# Altium PCB OFP_MCM_v1.5.PcbDoc (part 7 of 8)
Units mm, origin at the board's own origin, x right, y up, seen from the top; angles counter-clockwise.
Board outline 110 x 120 mm, 4 copper layers (Top Layer, Layer 1, Layer 2, Bottom Layer), stack 1.576 mm thick; 353 components, 268 nets, 1240 pads, 519 vias.
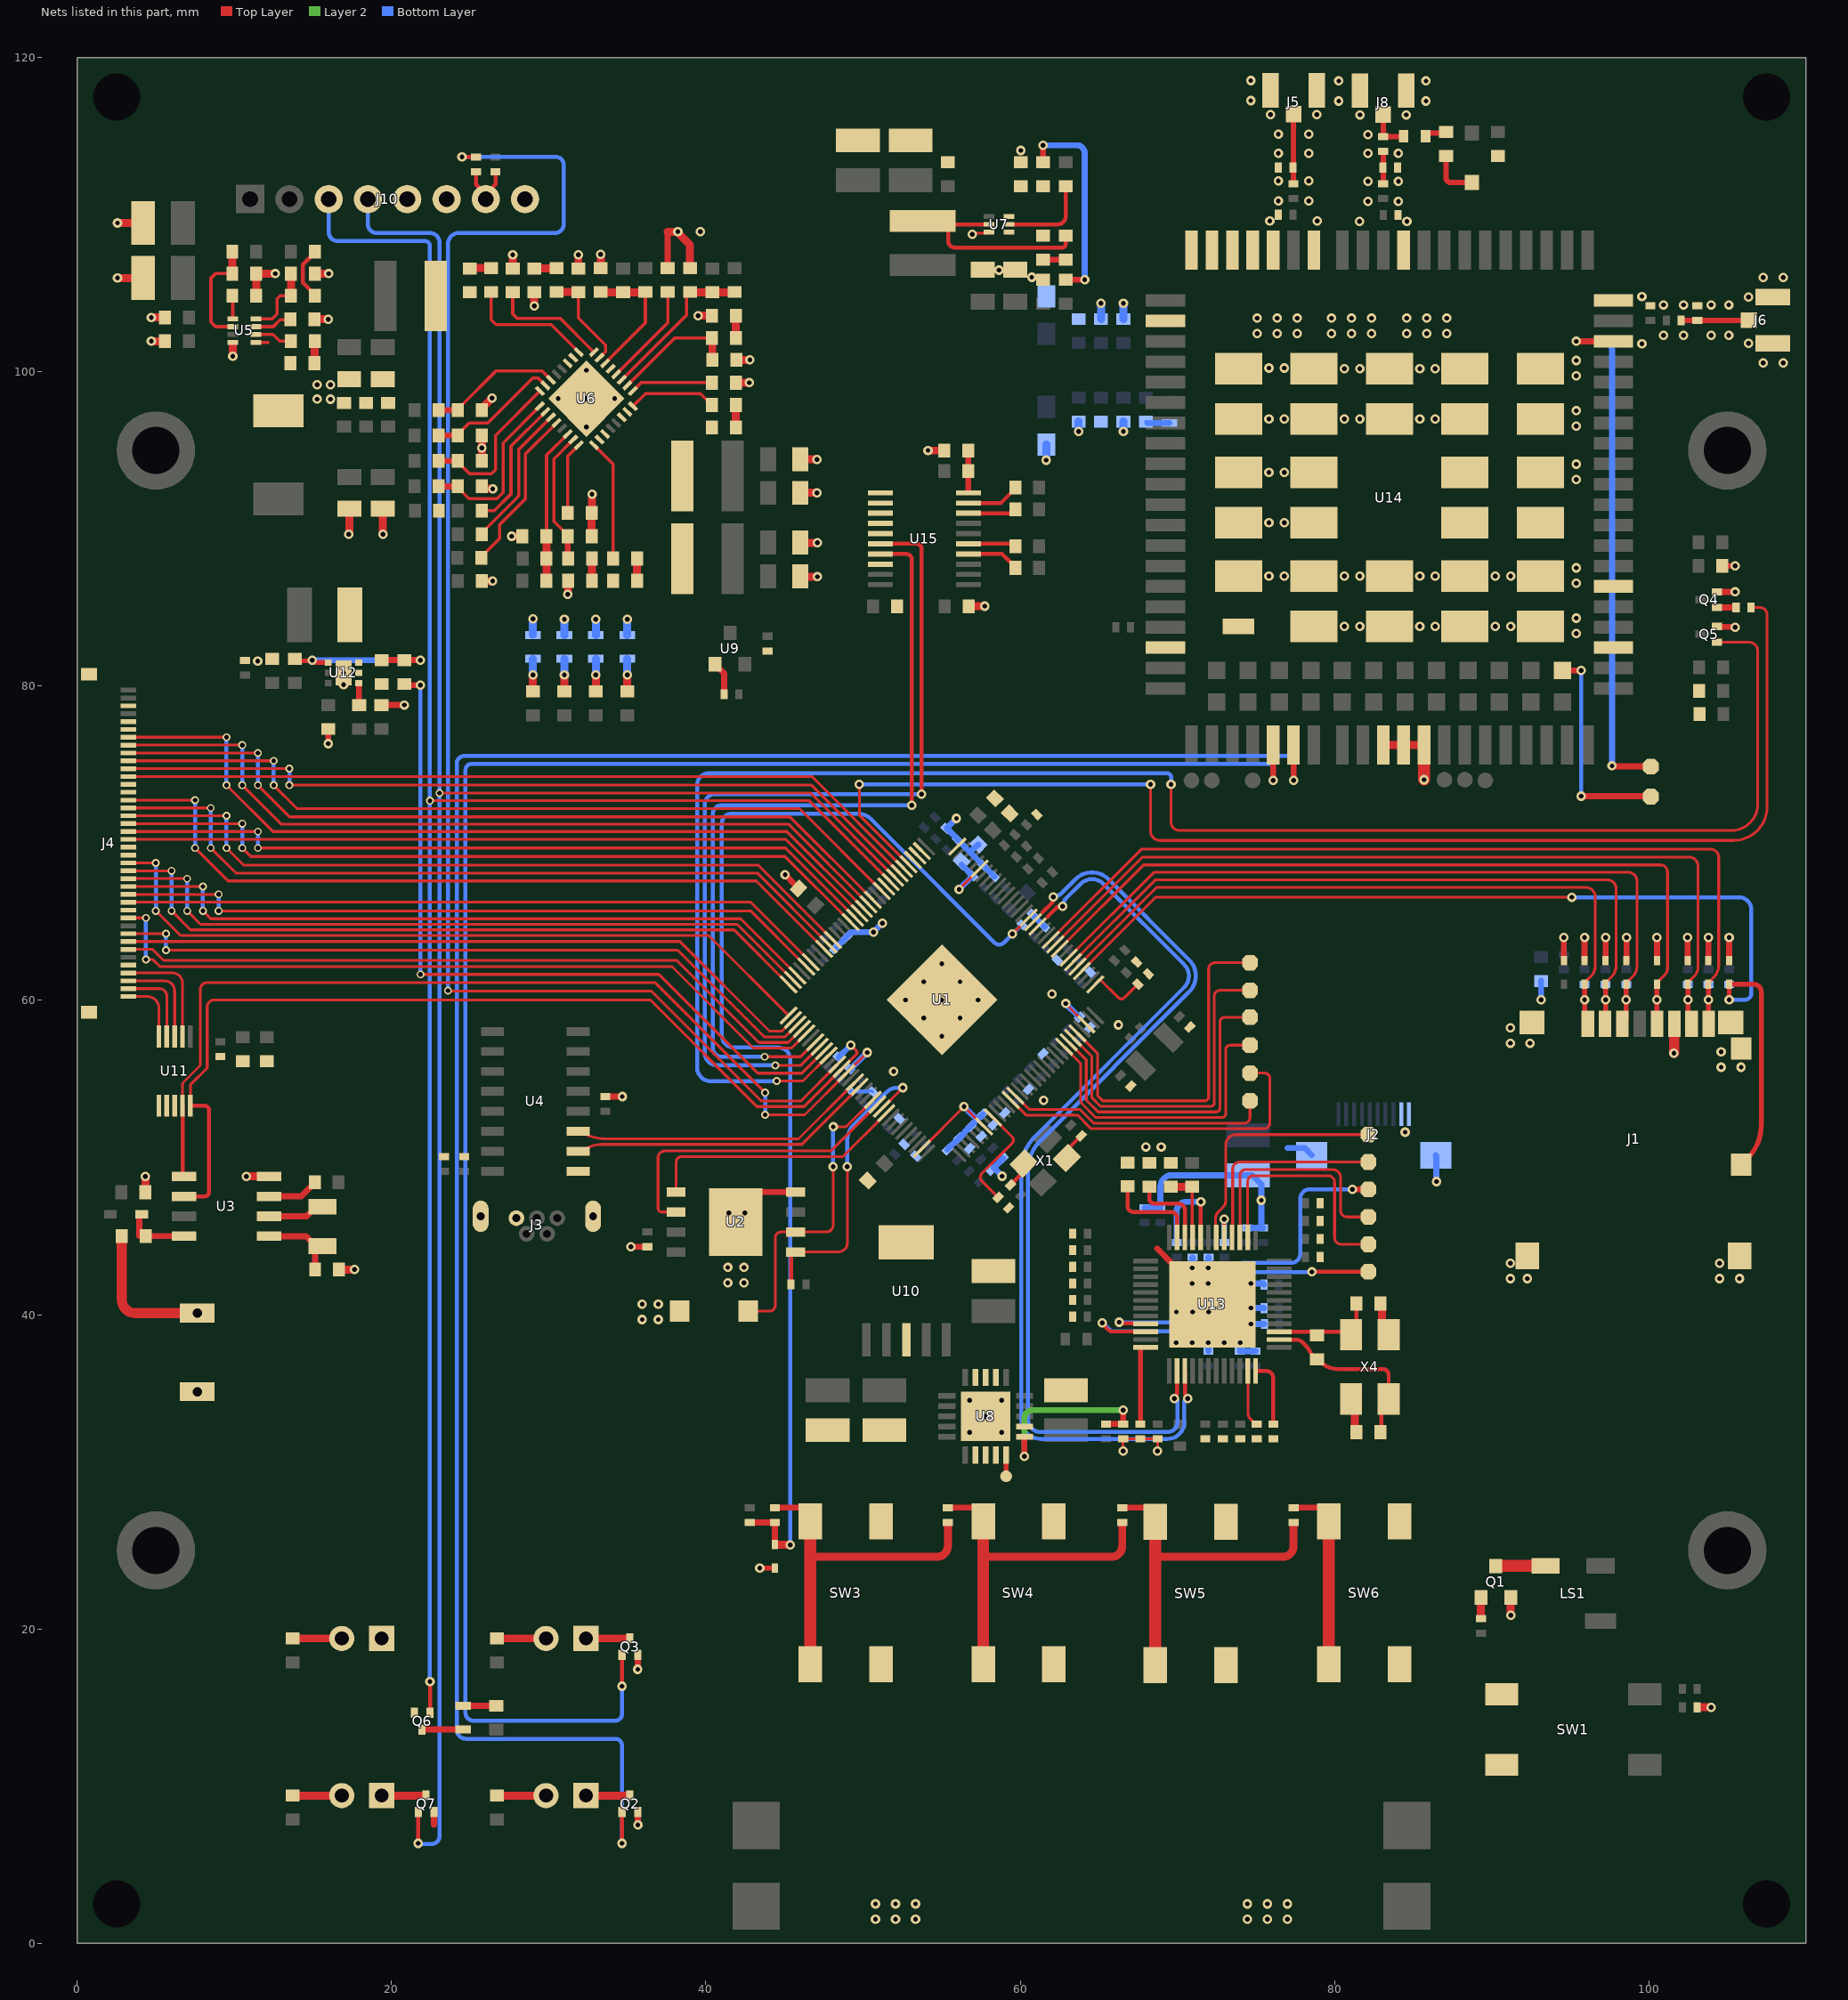
[diagram p5: the nets of this part, all layers, seen from the top]

## Via types
v1: diameter 0.6, hole 0.3, Top Layer to Bottom Layer, tented both sides, 475 vias
v2: diameter 0.5, hole 0.3, Top Layer to Bottom Layer, tented both sides, 44 vias

## Nets (pads, with @x,y where several pads share a name; then routed paths per layer and width w, separated by ;. In a path a pad name is that pad's centre, name@x,y a point inside that pad or via, vN(x,y) a via of type N, cw(c..) or ccw(c..) an arc to the next point about the centre after c; other vN are vias at no path point) (continued)
GND: C1.1 C2.1 C3.1 C4.1 C5.1 C6.1 C7.1 C8.2 C9.1 C10.1 C11.1 C12.1 C13.1 C14.1 C15.1 C16.1 C17.1 C18.1 C23.1 C24.1 C25.1 C26.1 C27.1 C28.1 C29.1 C30.1 C31.1 C32.1 C33.1 C34.1 C35.1 C36.1 C37.1 C38.1 C39.1 C40.1 C41.1 C42.1 C43.1 C44.1 C45.1 C46.1 C47.1 C48.1 C49.1 C50.1 C51.1 C52.1 C56.1 C57.1 C58.1 C59.1 C60.1 C61.1 C62.2 C63.2 C64.1 C67.1 C68.1 C69.2 C70.2 C71.1 C74.1 C76.1 C77.1 C78.1 C79.1 C80.1 C81.1 C82.1 C83.1 C84.1 C85.2 C86.2 C87.1 C88.1 C89.1 C90.1 C91.1 C92.1 C93.1 C94.1 C95.1 C96.1 C97.1 C98.1 C99.1 C100.2 C101.1 C102.1 C103.1 C104.1 C105.2 C106.1 C107.1 C108.1 C109.1 C110.1 C111.1 C112.1 C113.1 C114.1 C115.1 C116.1 C117.1 C118.1 C119.1 C120.1 C121.1 C122.1 C123.1 C124.1 C125.1 C126.1 C127.1 C128.1 C129.1 C130.1 C131.1 C132.1 C133.1 C134.1 C135.1 C136.1 C137.1 C138.1 C139.1 C140.1 C141.1 C142.1 C143.1 C145.1 C146.1 C149.1 D1.1 D2.1 D3.1 D4.1 D5.1 D6.1 D7.1 D8.1 D10.1 J1.6 J1.DN J1.SH1 J1.SH2 J1.SH3 J1.SH4 J2.9 J2.10 J2.MP1 J2.MP2 J3.5 J3.SH1 J3.SH2 J4.5 J4.12 J4.19 J4.20 J4.27 J4.28 J4.35 J4.36 J4.38 J4.S1 J4.S2 J5.2 J5.3 J6.2 J6.3 J8.2 J8.3 J10.8 LED1.1 LED2.2 LED3.2 LED4.2 LED5.2 Q1.2 Q2.1 Q3.1 Q4.1 Q5.1 Q6.1 Q7.1 R9.2 R29.1 R30.1 R37.2 R43.2 R45.1 R46.1 R48.2 R54.2 R60.2 R64.1 R66.1 R68.1 R73.1 R74.1 R75.1 R76.1 R85.1 R86.1 R87.1 R89.1 R90.1 R91.1 R95.1 R100.2 R104.1 SW1.1 SW2.2 SW3.1 SW3.2 SW4.1 SW4.2 SW5.1 SW5.2 SW6.1 SW6.2 U1.129 U2.4 U2.9 U3.4 U4.1 U5.4 U6.11 U6.14 U6.21 U6.27 U6.33 U7.3 U8.2 U8.3 U8.4 U8.12 U8.13 U8.14 U8.17 U8.21 U9.1 U10.3 U10.6 U11.6 U11.8 U12.5 U12.7 U13.49 U14.8 U14.9 U14.10 U14.19 U14.22 U14.36 U14.46 U14.48 U14.50 U14.51 U14.52 U14.53 U14.54 U14.56 U14.72 U14.85 U14.86 U14.87 U14.88 U14.89 U14.90 U14.91 U14.92 U14.93 U14.94 U14.95 U14.96 U14.97 U14.98 U14.99 U14.100 U14.101 U14.102 U14.103 U14.104 U14.105 U14.106 U14.107 U14.108 U14.109 U14.110 U14.111 U14.112 U15.11 X1.2 X1.4 X4.2 X4.4 | length 151.6
  Top Layer w0.178: v1(56.961,108.76) 57.031,108.83 57.95,108.83 U7.3@58.011,108.891 ; v1(66.552,31.327) R68.1@66.552,32.108 R87.1@67.64,32.108 C117.1@68.746,32.108 v1(68.746,31.327) ; U13.49@70.895,42.833 72.779,42.13 73.963,41.688 U13.49@72.232,40.667 cw(c72.232,41.952) 72.191,40.667 cw(c72.232,41.952) 72.157,40.669 cw(c72.232,41.952) 70.947,41.914 cw(c72.232,41.952) 70.947,41.952 v1(70.947,41.991) ; Q5.1@104.349,83.803 Q5.1@104.356,83.81
  Top Layer w0.254: R76.1@25.74,92.717 R76.1@25.747,92.71 ; Q3.1@35.666,18.35 Q3.1@35.677,18.34 ; C2.1@59.386,48.258 60.221,49.093 X1.2@60.221,49.623 ; X1.4@62.979,49.977 62.979,50.484 C1.1@63.882,51.388 ; v1(103.962,15.011) v1@103.962,15.015
  Top Layer w0.305: v1(43.434,23.87) D10.1@44.4,23.87
  Top Layer w0.381: v1(15.975,76.34) C98.1@15.975,77.277 ; R86.1@19.357,78.801 v1(20.816,78.801) ; 22.7,7.547 Q7.1@22.7,8.35 ; C13.1@33.698,53.884 v1(34.684,53.884) ; v1@35.238,44.325 C7.1@36.279,44.325 ; v1@35.666,7.547 Q2.1@35.666,8.35 ; v1(35.666,17.43) 35.666,18.329 Q3.1@35.677,18.34 ; R64.1@37.574,106.613 37.574,108.919 ; U9.1@40.592,81.401 40.811,81.132 40.939,81.039 41.162,80.816 C88.1@41.162,79.484 ; U2.9@41.915,45.9 41.915,46.296 43.424,47.805 U2.4@45.715,47.805 ; v1(45.041,68.005) 45.704,67.342 C37.1@45.898,67.122 ; C68.1@45.999,86.995 C68.1@46.028,86.966 ; C67.1@45.999,89.154 C67.1@46.028,89.125 ; 68.722,44.211 69.677,43.226 70.89,41.973 U13.49@70.909,41.954 ; D1.1@94.598,62.524 v1(94.598,64.008) ; D6.1@95.917,62.524 v1(95.917,64.008) ; D7.1@97.25,62.524 v1(97.25,64.008) ; D3.1@98.582,62.524 v1(98.582,64.008) ; D2.1@100.522,62.524 v1(100.522,64.008) ; D4.1@102.476,62.524 v1(102.476,64.008) ; D5.1@103.796,62.524 v1(103.796,64.008) ; Q4.1@104.349,86.003 v1(105.494,86.003) ; Q5.1@104.356,83.81 104.39,83.776 105.467,83.776 v1(105.494,83.75) ; R100.2@104.686,87.657 v1@105.494,87.657 ; D8.1@105.117,62.524 v1(105.117,64.008)
  Top Layer w0.508: v1(2.564,105.978) C47.1@4.194,105.978 ; v1(2.564,109.478) C48.1@4.194,109.478 ; C9.1@4.337,47.793 v1(4.337,48.805) ; v1(4.716,101.952) C49.1@5.591,101.952 ; v1(4.716,103.464) C149.1@5.591,103.464 ; v1(9.898,100.997) U5.4@9.898,101.766 ; v1(10.77,48.805) U3.4@12.2,48.805 ; R45.1@11.395,104.854 R43.2@11.395,106.254 v1(12.6,106.254) ; C56.1@15.1,103.352 v1(15.975,103.352) ; R46.1@15.125,106.254 v1(16,106.254) ; C10.1@16.662,42.875 v1(17.653,42.875) ; v1(17.272,89.662) 17.272,89.687 17.308,89.723 C51.1@17.308,91.284 ; v1(19.451,89.662) C50.1@19.451,91.284 ; C64.1@25.74,86.692 v1(26.434,86.692) ; R76.1@25.747,92.558 v1(26.441,92.558) ; R75.1@25.747,94.461 v1(25.747,95.155) R74.1@25.747,95.955 ; R73.1@25.913,97.845 v1(26.404,98.336) ; v1(27.636,89.541) R54.2@28.33,89.541 ; C71.1@27.714,106.587 v1(27.714,107.454) ; v1(29.083,104.197) C63.2@29.083,105.063 ; v1@31.219,85.849 C70.2@31.219,86.705 ; C62.2@31.891,106.587 v1(31.891,107.454) ; C69.2@32.737,89.541 C74.1@32.737,91.034 32.748,91.044 32.748,92.08 v1@32.758,92.091 ; R48.2@33.312,106.613 v1(33.312,107.479) ; 37.574,108.919 37.592,108.901 38.165,108.901 38.995,108.071 R60.2@38.995,106.613 ; v1(39.517,103.577) C86.2@40.384,103.577 ; C84.1@41.908,99.315 v1(42.775,99.315) ; C85.2@41.939,100.766 v1(42.805,100.766) ; C77.1@45.999,92.304 v1(47.07,92.304) ; C76.1@45.999,94.431 v1(47.07,94.431) ; C68.1@46.028,86.966 v1(47.099,86.966) ; C67.1@46.028,89.125 v1(47.099,89.125) ; v1(54.136,95) 54.144,94.992 55.163,94.992 R104.1@55.172,94.984 ; C139.1@56.713,85.076 C139.1@56.721,85.084 57.741,85.084 v1(57.749,85.092) ; C109.1@81.309,32.628 X4.4@81.309,34.086 ; C110.1@82.929,40.711 83.025,40.615 83.025,39.157 X4.2@83.451,38.731 ; U14.8@83.1,76.25 U14.9@84.4,76.25 U14.10@85.7,76.25 ; v1(91.222,20.873) Q1.2@91.222,22.006 ; C3.1@103.164,15.015 v1@103.962,15.015
  Top Layer w0.635: v1@101.622,56.664 J1.6@101.622,58.505
  Top Layer w0.762: v1(85.7,74.05) U14.10@85.7,76.25
  Bottom Layer w0.178: C39.1@49.272,54.183 49.415,54.183 49.469,54.183 C39.1@49.496,54.209 ; C42.1@50.322,54.209 50.362,54.249 50.56,54.249 C42.1@50.623,54.186
  Bottom Layer w0.254: C39.1@49.209,54.246 C39.1@49.272,54.183 ; C39.1@49.415,54.183 49.449,54.216 C42.1@50.315,54.216
  Bottom Layer w0.381: C38.1@48.208,63.288 49.275,64.355 v1(50.67,64.355) v1(51.236,64.92) ; v1(55.945,71.585) 55.326,70.967 55.409,70.878 55.954,70.332 C34.1@56.02,70.219 56.11,70.129 56.794,69.445 ; C11.1@57.356,69.931 56.794,69.445 ; C31.1@58.356,67.883 58.266,67.973 C12.1@57.643,68.596 56.794,69.445 ; v1(58.86,48.811) 58.319,49.351 58.916,49.949 C17.1@58.922,49.949 ; C26.1@60.785,65.48 60.863,65.379 61.468,64.774 C27.1@61.556,64.683 ; C124.1@67.912,46.798 C126.1@68.926,46.798 68.926,48.153 cw(c69.645,48.153) 69.645,48.872 C104.1@74.498,48.872 74.775,48.872 75.346,48.301 v1(75.346,47.282) 75.346,45.645 ccw(c75.465,45.645) C135.1@75.465,45.526 C128.1@74.451,45.526 ; v1(70.947,42.973) 70.961,42.987 70.961,43.632 C112.1@70.975,43.647 ; v1@71.969,38.373 71.976,38.367 71.976,37.693 C130.1@71.982,37.687 ; v1(71.969,42.973) 71.979,42.983 71.979,43.637 C113.1@71.989,43.647 ; v1@74.013,38.373 73.998,38.358 73.998,37.702 C134.1@73.982,37.687 C132.1@74.982,37.687 ; v1@74.552,39.412 75.499,39.412 C116.1@75.537,39.417 ; v1@74.552,40.435 75.479,40.435 C115.1@75.517,40.417 ; v1@74.552,41.991 75.479,41.991 C125.1@75.517,41.917 ; 77.027,50.616 78.091,50.616 J2.MP2@78.549,50.158 ; J2.MP1@86.449,50.158 86.487,50.12 v1(86.487,48.471) ; v1(93.157,60.049) C4.1@93.157,61.245
  Bottom Layer w0.508: LED2.2@29,83.278 v1(29,84.282) ; LED3.2@31,83.25 v1(31,84.254) ; LED4.2@33,83.25 v1(33,84.254) ; LED5.2@35,83.25 v1(35,84.254) ; v1(61.664,94.38) C105.2@61.664,95.384 ; v1(63.719,96.215) C106.1@63.719,96.838 ; C102.1@65.146,103.362 v1(65.146,104.366) ; v1(66.573,96.215) C108.1@66.573,96.838 ; C103.1@66.573,103.362 v1(66.573,104.366)
  other v1: 50.794,1.524 52.07,1.524 53.343,1.524 74.457,1.524 75.73,1.524 77.006,1.524 50.794,2.507 52.07,2.507 53.343,2.507 74.457,2.507 75.73,2.507 77.006,2.507 35.677,7.536 56.789,32.52 58.827,32.52 57.808,33.539 56.789,34.558 58.827,34.558 69.925,38.221 70.947,38.221 71.969,38.221 72.991,38.221 74.013,38.221 74.679,39.412 35.95,39.695 36.973,39.695 69.944,40.175 70.967,40.175 71.989,40.175 74.679,40.435 35.95,40.677 36.973,40.677 71.969,41.991 74.679,41.991 41.396,42.028 42.418,42.028 91.198,42.299 92.272,42.299 104.499,42.299 105.772,42.299 41.396,43.01 42.418,43.01 91.198,43.282 104.499,43.282 35.238,44.32 41.455,46.473 42.478,46.473 67.997,50.679 68.979,50.679 84.499,51.615 61.496,53.647 51.953,55.482 104.604,55.753 105.877,55.753 101.6,56.642 104.604,56.736 91.198,57.276 92.445,57.276 55.02,57.726 91.198,58.259 66.256,58.443 53.866,58.88 56.174,58.88 52.712,60.034 55.02,60.034 57.328,60.034 62.019,60.406 53.866,61.188 56.174,61.188 55.02,62.342 16.95,80.087 16.95,80.85 11.483,81.603 95.394,83.347 80.632,83.797 81.615,83.797 85.432,83.797 86.415,83.797 90.232,83.797 91.215,83.797 95.394,84.329 31.209,85.838 95.394,86.547 75.832,86.997 76.815,86.997 80.632,86.997 81.615,86.997 85.432,86.997 86.415,86.997 90.232,86.997 91.215,86.997 95.394,87.529 105.497,87.66 75.832,90.397 76.815,90.397 32.758,92.218 95.394,93.147 75.832,93.597 76.815,93.597 95.394,94.129 32.4,96.5 95.394,96.547 75.832,96.997 76.815,96.997 80.632,96.997 81.615,96.997 85.432,96.997 86.415,96.997 95.394,97.529 15.263,98.266 16.109,98.262 30.6,98.3 32.4,98.3 34.2,98.3 15.263,99.181 16.109,99.177 95.394,99.747 32.4,100.1 80.632,100.197 81.615,100.197 85.432,100.197 86.415,100.197 75.832,100.247 76.815,100.247 107.275,100.568 108.551,100.568 95.394,100.729 99.567,101.782 106.35,101.817 100.943,102.322 102.216,102.322 103.972,102.322 105.092,102.322 75.073,102.438 76.349,102.438 77.622,102.438 79.803,102.438 81.079,102.438 82.352,102.438 84.597,102.438 85.873,102.438 87.146,102.438 75.073,103.421 76.349,103.421 77.622,103.421 79.803,103.421 81.079,103.421 82.352,103.421 84.597,103.421 85.873,103.421 87.146,103.421 100.943,104.262 102.216,104.262 103.972,104.262 105.092,104.262 106.35,104.767 99.567,104.802 60.74,106.021 107.275,106.016 108.551,106.016 58.655,106.476 38.222,108.929 39.643,108.929 81.59,109.575 84.61,109.575 75.89,109.6 78.91,109.6 82.13,110.85 84.07,110.85 76.43,110.875 78.37,110.875 82.13,112.123 84.07,112.123 76.43,112.148 78.37,112.148 76.43,113.904 78.37,113.904 82.13,113.904 84.07,113.904 60.043,114.094 82.13,115.1 76.43,115.125 78.37,115.125 81.625,116.358 84.575,116.358 75.925,116.383 78.875,116.383 80.274,117.241 85.824,117.241 74.676,117.266 80.274,118.517 85.824,118.517 74.676,118.542
GSM_CTS: U15.12
GSM_DCD: U15.18
GSM_DTR: U15.14
GSM_PWR: Q4.2 R117.1 | length 1.2
  Top Layer w0.381: Q4.2@104.349,85.002 R117.1@105.554,85.003
GSM_RI: U15.15
GSM_RST: Q5.2 U1.42 | length 112.3
  Top Layer w0.178: v2(44.505,54.873) 46.183,54.873 U1.42@47.808,56.498 ; v1(69.6,73.746) 69.6,71.357 ccw(c70.142,71.357) 70.142,70.815 105.258,70.815 ccw(c105.258,72.492) 106.934,72.492 106.934,82.226 ccw(c106.358,82.226) 106.358,82.802 Q5.2@104.349,82.802
  Bottom Layer w0.254: v2@44.428,54.86 40.313,54.86 cw(c40.313,55.728) 39.446,55.728 39.446,73.713 cw(c40.204,73.713) 40.204,74.47 69.319,74.47 cw(c69.319,74.168) 69.621,74.168 69.621,73.767 cw(c69.6,73.767) v1(69.6,73.746)
GSM_RTS: U15.13
HPVCCBP: C11.2 C12.2 U1.123 | length 4.1
  Top Layer w0.178: v1(56.116,67.069) U1.123@57.424,68.377
  Bottom Layer w0.381: v1@56.117,67.069 C12.2@56.991,67.944 ; C11.2@56.278,68.632 C12.2@56.979,67.931
HUB_XI: C109.2 R93.1 U13.38 X4.1 | length 11.7
  Top Layer w0.254: U13.38@76.495,38.429 77.155,38.415 77.525,38.407 cw(c77.52,38.153) 77.528,38.407 cw(c77.497,37.653) 78.03,38.187 cw(c75.979,36.134) 78.578,37.424 R93.1@78.895,37.17 79.204,36.916 ccw(c80.195,38.066) 80.195,36.548 83.062,36.548 cw(c83.062,36.16) 83.451,36.16 X4.1@83.451,34.631 82.984,34.164 82.984,32.587 C109.2@82.929,32.532
HUB_XO: C110.2 R93.2 U13.39 X4.3 | length 6.6
  Top Layer w0.178: X4.3@81.051,38.731 X4.3@81.405,39.085
  Top Layer w0.254: U13.39@76.482,38.917 R93.2@78.641,38.917 ; R93.2@78.895,38.694 79.118,38.917 80.866,38.917 X4.3@81.051,38.731 ; X4.3@81.405,39.085 C110.2@81.405,40.711
I2C0_SCL: R18.2 U1.45 U3.6 U11.10 | length 62.7
  Top Layer w0.178: U11.10@7.2,53.3 7.2,54.626 8.267,55.692 8.267,59.561 cw(c8.74,59.561) 8.74,60.034 36.466,60.034 43.255,53.245 46.252,53.245 U1.45@48.657,55.65 49.571,56.564 ccw(c49.447,56.688) 49.571,56.812 v1(49.231,57.152)
  Top Layer w0.254: U3.6@6.8,47.535 8.126,47.535 ccw(c8.126,47.793) 8.384,47.793 8.384,53.018 ccw(c8.102,53.018) 8.102,53.3 U11.10@7.2,53.3
  Bottom Layer w0.381: R18.2@48.451,56.332 48.451,56.377 v1@49.226,57.152
I2C0_SDA: R19.2 U1.46 U3.5 U11.9 | length 62.6
  Top Layer w0.178: U3.5@6.7,48.905 ccw(c6.8,48.905) U3.5@6.8,48.805 ; U11.9@6.7,53.3 6.7,54.734 7.833,55.867 7.833,60.708 cw(c8.267,60.708) 8.267,61.141 36.764,61.141 v2(43.776,54.129) ; v2@43.748,52.72 46.292,52.72 U1.46@48.939,55.367 ; U1.46@48.939,55.367 v1@50.261,56.689
  Top Layer w0.254: U3.5@6.7,48.905 U11.9@6.7,53.3
  Bottom Layer w0.254: v2(43.776,52.72) v2(43.776,54.129)
  Bottom Layer w0.381: R19.2@49.205,55.578 49.205,55.632 v1@50.257,56.684
  other v1: 50.266,56.684
KEYADC0: C26.2 D10.2 R11.1 R13.1 U1.112 | length 78.3
  Top Layer w0.178: v1(59.497,64.228) U1.112@60.535,65.266
  Top Layer w0.381: R11.1@42.8,26.783 R13.1@44.4,26.783 D10.2@44.4,25.369
  Top Layer w0.508: D10.2@44.458,25.362 45.357,25.362 v1@45.358,25.361
  Bottom Layer w0.254: v1@45.361,25.362 45.361,56.273 ccw(c44.63,56.273) 44.63,57.003 41.784,57.003 cw(c41.784,57.766) 41.021,57.766 41.021,71.272 cw(c41.631,71.272) 41.631,71.882 49.68,71.882 49.683,71.882 cw(c49.682,70.706) 50.513,71.538 50.514,71.537 51.4,70.651 51.406,70.645 58.375,63.675 ccw(c58.673,63.97) 58.969,63.675 v1@59.51,64.215 ; v1@59.505,64.219 60.012,64.726 C26.2@60.12,64.815
  other v1: 45.364,25.355
LCD_CLK: J4.11 U1.37 | length 48.5
  Top Layer w0.178: J4.11@3.25,65.25 v2@4.4,65.25 ; v2@4.4,62.6 4.82,62.6 5.269,62.151 37.849,62.151 43.03,56.97 45.451,56.97 U1.37@46.394,57.913
  Bottom Layer w0.254: v2(4.375,65.25) 4.375,62.626 v2@4.4,62.6
  other v2: 4.375,62.6
LCD_D2: J4.18 U1.33 | length 47.8
  Top Layer w0.178: J4.18@3.25,68.75 v2(5,68.75) ; v2(5,65.7) 6.567,64.133 40.173,64.133 U1.33@45.262,59.044
  Bottom Layer w0.254: v2(5,65.7) v2(5,68.75)
LCD_D3: J4.17 U1.32 | length 46.5
  Top Layer w0.178: J4.17@3.25,68.25 v2(6,68.25) ; v2(6,65.7) 7.211,64.489 41.797,64.489 U1.32@45.262,61.023
  Bottom Layer w0.254: v2(6,65.7) v2(6,68.25)
LCD_D4: J4.16 U1.31 | length 46.2
  Top Layer w0.178: J4.16@3.25,67.75 v2(7,67.75) ; v2(7,65.7) 7.856,64.844 42.007,64.844 U1.31@45.545,61.306
  Bottom Layer w0.254: v2(7,65.7) v2(7,67.75)
LCD_D5: J4.15 U1.30 | length 45.8
  Top Layer w0.178: J4.15@3.25,67.25 v2(8,67.25) ; v2(8,65.7) 8.5,65.2 42.217,65.2 U1.30@45.828,61.589
  Bottom Layer w0.254: v2(8,65.7) v2(8,67.25)
LCD_D6: J4.14 U1.28 | length 45.7
  Top Layer w0.178: J4.14@3.25,66.75 v2(9,66.75) ; v2(9,65.7) 42.848,65.7 U1.28@46.394,62.155
  Bottom Layer w0.254: v2(9,65.7) v2(9,66.75)
LCD_D7: J4.13 U1.27 | length 45
  Top Layer w0.178: J4.13@3.25,66.25 42.864,66.25 U1.27@46.677,62.438
LCD_D10: J4.26 U1.24 | length 50
  Top Layer w0.178: J4.26@3.25,72.75 v2(7.5,72.75) ; v2(7.5,69.7) 9.595,67.605 43.206,67.605 U1.24@47.525,63.286
  Bottom Layer w0.254: v2(7.5,69.7) v2(7.5,72.75)
LCD_D11: J4.25 U1.23 | length 49.6
  Top Layer w0.178: J4.25@3.25,72.25 v2(8.5,72.25) ; v2(8.5,69.7) 10.094,68.106 43.271,68.106 U1.23@47.808,63.569
  Bottom Layer w0.254: v2(8.5,69.7) v2(8.5,72.25)
LCD_D12: J4.24 U1.22 | length 49.3
  Top Layer w0.178: J4.24@3.25,71.75 v2(9.5,71.75) ; v2(9.5,69.7) 10.591,68.609 43.334,68.609 U1.22@48.091,63.852
  Bottom Layer w0.254: v2(9.5,69.7) v2(9.5,71.75)
LCD_D13: J4.23 U1.18 | length 49.5
  Top Layer w0.178: J4.23@3.25,71.25 v2@10.5,71.25 ; v2(10.5,69.7) 11.036,69.164 45.042,69.164 U1.18@49.222,64.983
  Bottom Layer w0.254: v2(10.5,69.7) v2(10.5,71.25)
LCD_D14: J4.22 U1.17 | length 49.1
  Top Layer w0.178: J4.22@3.25,70.75 v2(11.5,70.75) ; v2(11.5,69.7) 45.071,69.7 U1.17@49.505,65.266
  Bottom Layer w0.254: v2(11.5,69.7) v2(11.5,70.75)
LCD_D15: J4.21 U1.16 | length 48.5
  Top Layer w0.178: J4.21@3.25,70.25 45.086,70.25 U1.16@49.788,65.549
LCD_D18: J4.34 U1.15 | length 53.1
  Top Layer w0.178: J4.34@3.25,76.75 v2(9.5,76.75) ; v2(9.5,73.7) 12.453,70.747 45.155,70.747 U1.15@50.071,65.832
  Bottom Layer w0.254: v2(9.5,73.7) v2(9.5,76.75)
LCD_D19: J4.33 U1.14 | length 52.8
  Top Layer w0.178: J4.33@3.25,76.25 v2(10.5,76.25) ; v2(10.5,73.7) 12.981,71.219 45.249,71.219 U1.14@50.353,66.115
  Bottom Layer w0.254: v2(10.5,73.7) v2(10.5,76.25)
LCD_D20: J4.32 U1.13 | length 52.5
  Top Layer w0.178: J4.32@3.25,75.75 v2(11.5,75.75) ; v2(11.5,73.7) 13.516,71.684 45.349,71.684 U1.13@50.636,66.397
  Bottom Layer w0.254: v2(11.5,73.7) v2(11.5,75.75)
LCD_D21: J4.31 U1.11 | length 52.3
  Top Layer w0.178: J4.31@3.25,75.25 v2(12.5,75.25) ; v2(12.5,73.7) 13.992,72.208 45.957,72.208 U1.11@51.202,66.963
  Bottom Layer w0.254: v2(12.5,73.7) v2(12.5,75.25)
LCD_D22: J4.30 U1.7 | length 52.5
  Top Layer w0.178: J4.30@3.25,74.75 13.49,74.75 v2(13.5,74.76) ; v2(13.5,73.7) 46.728,73.7 U1.7@52.333,68.094
  Bottom Layer w0.254: v2(13.5,73.7) v2(13.5,74.76)
LCD_D23: J4.29 U1.6 | length 51.8
  Top Layer w0.178: J4.29@3.25,74.25 46.743,74.25 U1.6@52.616,68.377
LCD_DE: J4.7 U1.36 | length 45.7
  Top Layer w0.178: J4.7@3.25,63.25 4.798,63.25 5.497,62.551 38.149,62.551 43.374,57.326 45.241,57.326 U1.36@46.111,58.195
LCD_HSYNC: J4.9 U1.35 | length 46.2
  Top Layer w0.178: J4.9@3.25,64.25 v2(5.65,64.25) ; v2(5.65,63.2) 38.2,63.2 43.719,57.681 45.031,57.681 U1.35@45.828,58.478
  Bottom Layer w0.254: v2(5.65,63.2) v2(5.65,64.25)
LCD_PB2: R83.1 U1.41 | length 48.3
  Top Layer w0.178: v2(21.844,61.656) 37.023,61.656 43.311,55.368 46.112,55.368 U1.41@47.525,56.781
  Top Layer w0.381: R83.1@20.816,80.061 v1(21.844,80.061)
  Bottom Layer w0.254: v2(21.844,61.656) v1(21.844,80.061)
LCD_VSYNC: J4.8 U1.34 | length 45
  Top Layer w0.178: J4.8@3.25,63.75 38.35,63.75 44.053,58.047 44.831,58.047 U1.34@45.545,58.761
MB_RXD: J10.6
MB_TXD: J10.5
MCU_RST: R118.2 U1.44 | length 95.6
  Top Layer w0.178: v2@23.592,60.724 v2@23.609,60.706 ; v2@23.609,60.604 36.521,60.604 43.525,53.601 46.041,53.601 U1.44@48.373,55.933
  Top Layer w0.254: v1@24.496,113.68 25.37,113.68 R118.2@25.38,113.67
  Bottom Layer w0.254: v2@23.592,60.724 23.592,108.134 cw(c24.3,108.134) 24.3,108.842 30.411,108.842 ccw(c30.411,109.381) 30.95,109.381 30.95,113.195 ccw(c30.455,113.195) 30.455,113.69 v1@24.491,113.69
  other v1: 24.486,113.69
  other v2: 23.592,60.622
NET_MODE: Q3.2 U14.5 | length 129
  Top Layer w0.254: Q3.2@34.666,18.35 34.669,18.347 34.669,16.36 v1(34.671,16.358)
  Top Layer w0.381: v1(76.1,74) U14.5@76.1,76.25
  Bottom Layer w0.254: v1(34.671,16.358) 34.671,14.591 cw(c34.247,14.591) 34.247,14.166 25.207,14.166 cw(c25.207,14.667) 24.706,14.667 24.706,74.668 cw(c25.095,74.668) 25.095,75.057 75.783,75.057 cw(c75.783,74.74) 76.1,74.74 v1(76.1,74)
NET_STATUS: Q2.2 U14.6 | length 138
  Top Layer w0.254: Q2.2@34.664,8.352 Q2.2@34.666,8.35 34.666,6.362 v1(34.669,6.36)
  Top Layer w0.381: v1(77.4,74) U14.6@77.4,76.25
  Bottom Layer w0.254: v1(34.669,6.36) 34.669,12.585 ccw(c34.247,12.585) 34.247,13.007 24.741,13.007 cw(c24.741,13.601) 24.147,13.601 24.147,75.068 cw(c24.644,75.068) 24.644,75.565 76.986,75.565 cw(c76.986,75.151) 77.4,75.151 v1(77.4,74)
NetC8_1: C8.1 R12.2 | length 9.3
  Top Layer w0.635: R12.2@2.838,45 2.838,40.967 ccw(c3.705,40.967) 3.705,40.1 C8.1@7.64,40.1
NetC10_2: C10.2 U3.1 X3.1 | length 4.8
  Top Layer w0.381: U3.1@12.2,44.995 14.57,44.995 15.2,44.365 15.138,44.303 C10.2@15.138,42.875
NetC53_1: C53.1 R39.2 | length 1.4
  Top Layer w0.508: C53.1@15.1,100.552 15.113,100.565 15.113,101.94 R39.2@15.125,101.952
NetC53_2: C53.2 L1.1 U5.5 | length 0.9
  Top Layer w0.203: U5.5@11.368,101.881 12.159,101.881 ; C53.2@13.576,100.552 C53.2@13.576,100.616
NetC54_1: C54.1 R42.2 | length 1.3
  Top Layer w0.508: C54.1@25.002,106.613 R42.2@26.345,106.613
NetC54_2: C54.2 L2.1 U6.26
NetC56_2: C56.2 U5.7 | length 2.4
  Top Layer w0.203: U5.7@11.368,102.881 12.481,102.881 12.913,103.312 13.536,103.312 C56.2@13.576,103.352
NetC62_1: C62.1 R49.2 U6.23 | length 6.4
  Top Layer w0.203: C62.1@31.891,105.063 31.891,105.038 31.891,103.433 33.615,101.708 33.615,101.283 U6.23@33.238,100.906
  Top Layer w0.508: R49.2@30.504,105.089 C62.1@31.865,105.089
NetC63_1: C63.1 R49.1 | length 1.4
  Top Layer w0.508: C63.1@29.083,106.587 R49.1@30.504,106.587
NetC65_1: C65.1 R52.2 | length 1.4
  Top Layer w0.508: C65.1@35.627,86.705 R52.2@35.627,88.124
NetC65_2: C65.2 L3.1 U6.10 | length 1.5
  Top Layer w0.203: L3.1@38.5,86.554 L3.1@38.5,88.104
NetC69_1: C69.1 R56.1 U6.7 | length 8.5
  Top Layer w0.203: R56.1@31.213,88.141 R56.1@31.23,88.124 ; C69.1@31.213,89.541 31.213,89.604 30.331,90.486 30.331,94.461 U6.7@31.562,95.694 U6.7@31.562,95.694
  Top Layer w0.381: R56.1@31.213,88.141 C69.1@31.213,89.541
NetC70_1: C70.1 R56.2 | length 1.4
  Top Layer w0.508: C70.1@32.754,86.705 R56.2@32.754,88.124
NetC71_2: C71.2 U6.24 | length 7.6
  Top Layer w0.203: C71.2@27.714,105.063 27.714,103.683 28.001,103.396 30.748,103.396 U6.24@32.884,101.259
NetC72_1: C72.1 R57.2 | length 1.4
  Top Layer w0.508: C72.1@41.908,96.473 R57.2@41.908,97.894
NetC72_2: C72.2 L4.1 U6.15
NetC74_2: C74.2 U6.8 | length 4.6
  Top Layer w0.203: C74.2@31.213,91.034 31.213,94.638 U6.8@31.916,95.341
NetC75_1: C75.1 R58.2 | length 1.4
  Top Layer w0.381: R58.2@61.456,107.139 C75.1@62.897,107.14
NetC75_2: C75.2 L5.1 U7.2 | length 13.8
  Top Layer w0.254: L5.1@53.799,109.606 ccw(c54.014,109.606) 54.014,109.391 L5.1@55.414,109.391 ; U7.2@58.011,109.391 L5.1@55.414,109.391 ; C75.2@62.897,108.664 62.897,108.136 cw(c62.662,108.136) 62.662,107.901 55.865,107.901 cw(c55.865,108.353) 55.414,108.353 L5.1@55.414,109.391
NetC84_2: C84.2 U6.17 | length 5.2
  Top Layer w0.203: U6.17@35.359,98.784 35.889,99.315 C84.2@40.384,99.315
NetC85_1: C85.1 R65.1 U6.18 | length 8
  Top Layer w0.203: U6.18@35.006,99.138 38.024,102.156 R65.1@40.384,102.156
  Top Layer w0.508: C85.1@40.415,100.766 R65.1@40.415,102.125
NetC86_1: C86.1 R65.2 | length 1.4
  Top Layer w0.508: R65.2@41.908,102.156 C86.1@41.908,103.577
NetC99_2: C99.2 U13.11 | length 6.1
  Top Layer w0.254: C99.2@66.84,48.164 66.84,46.905 ccw(c67.21,46.905) 67.21,46.535 69.62,46.535 cw(c69.62,46.174) 69.982,46.174 69.982,45.59 U13.11@69.982,44.917
NetC137_2: C137.2 J5.1 R101.1 | length 4.4
  Top Layer w0.343: R101.1@77.383,111.97 77.383,116.383 J5.1@77.4,116.4
NetC141_2: C141.2 J6.1 R109.1 | length 4.3
  Top Layer w0.178: J6.1@106.367,103.275 J6.1@106.367,103.292
  Top Layer w0.343: R109.1@102.07,103.275 J6.1@106.367,103.275
NetC144_1: C144.1 C145.2 R113.1 | length 2.1
  Top Layer w0.178: R113.1@83.092,111.97 R113.1@83.1,111.978
  Top Layer w0.343: R113.1@83.1,111.978 C144.1@83.1,114.03
NetC144_2: C144.2 J8.1 L7.2 | length 2.7
  Top Layer w0.178: L7.2@84.37,114.97 L7.2@84.4,115
  Top Layer w0.343: J8.1@83.1,116.375 C144.2@83.1,114.97 L7.2@84.37,114.97
NetD9_2: D9.2 R12.1 U3.8 | length 3.9
  Top Layer w0.381: 3.956,45 3.956,46.243 cw(c4.105,46.243) D9.2@4.105,46.393 ; R12.1@4.362,45 6.8,45 U3.8@6.8,44.995
NetD11_2: D11.2 R112.1 | length 3.2
  Top Layer w0.343: R112.1@87.1,113.738 87.1,112.356 ccw(c87.4,112.356) 87.4,112.056 D11.2@88.74,112.056
NetL6_2: L6.2 U12.6
NetL7_1: L7.1 R112.2 | length 1.4
  Top Layer w0.343: L7.1@85.8,115 85.999,115.199 87.037,115.199 R112.2@87.1,115.262
NetLED1_2: LED1.2 R77.1 | length 3.1
  Top Layer w0.508: R77.1@13.716,19.4 LED1.2@16.83,19.4
NetLED2_1: LED2.1 R78.1 | length 2.1
  Top Layer w0.508: R78.1@29,79.662 v1(29,80.718)
  Bottom Layer w0.508: v1(29,80.718) LED2.1@29,81.722
NetLED3_1: LED3.1 R79.1 | length 2.1
  Top Layer w0.508: R79.1@31,79.662 v1(31,80.718)
  Bottom Layer w0.508: v1(31,80.718) LED3.1@31,81.722
NetLED4_1: LED4.1 R80.1 | length 2.1
  Top Layer w0.508: R80.1@33,79.662 v1(33,80.718)
  Bottom Layer w0.508: v1(33,80.718) LED4.1@33,81.722
NetLED5_1: LED5.1 R81.1 | length 2.1
  Top Layer w0.508: R81.1@35,79.662 v1(35,80.718)
  Bottom Layer w0.508: v1(35,80.718) LED5.1@35,81.722
NetLED6_1: LED6.1 Q2.3 | length 2.7
  Top Layer w0.508: LED6.1@32.37,9.4 Q2.3@35.115,9.4
NetLED6_2: LED6.2 R97.1 | length 3.2
  Top Layer w0.508: R97.1@26.67,9.4 LED6.2@29.83,9.4
NetLED7_1: LED7.1 Q3.3 | length 2.7
  Top Layer w0.508: LED7.1@32.37,19.4 Q3.3@35.115,19.4
NetLED7_2: LED7.2 R98.1 | length 3.1
  Top Layer w0.508: R98.1@26.716,19.4 LED7.2@29.83,19.4
NetLED8_1: LED8.1 R114.1 | length 1.6
  Bottom Layer w0.178: R114.1@68,96.838 ccw(c68.09,96.838) R114.1@68.09,96.748
  Bottom Layer w0.381: R114.1@68.09,96.748 LED8.1@69.507,96.748
NetLED9_1: 
NetLED10_1: LED10.1 R120.1 | length 2.1
  Top Layer w0.381: LED10.1@24.546,15.111 R120.1@26.67,15.111
NetLED10_2: LED10.2 Q6.3 | length 2.6
  Top Layer w0.254: Q6.3@21.946,13.608 Q6.3@21.946,13.608 ; LED10.2@24.544,13.609 LED10.2@24.546,13.611
  Top Layer w0.381: Q6.3@21.946,13.608 Q6.3@21.946,13.608 LED10.2@24.544,13.609
NetLED11_1: LED11.1 Q7.3 | length 2.7
  Top Layer w0.508: LED11.1@19.37,9.4 Q7.3@22.115,9.4
NetLED11_2: LED11.2 R121.1 | length 3.1
  Top Layer w0.508: R121.1@13.716,9.4 LED11.2@16.83,9.4
NetLS1_2: LS1.2 Q1.3 | length 3.1
  Top Layer w0.254: LS1.2@93.432,24.006 LS1.2@93.432,24.015
  Top Layer w0.762: Q1.3@90.364,24.006 LS1.2@93.432,24.006
NetQ1_1: Q1.1 R17.2 | length 1.2
  Top Layer w0.508: R17.2@89.322,20.761 Q1.1@89.322,22.006
NetR9_1: R9.1 U1.94 | length 3.1
  Top Layer w0.178: v1@62.89,59.8 U1.94@64.212,58.478
  Bottom Layer w0.178: R9.1@63.776,58.94 R9.1@63.776,58.95
  Bottom Layer w0.381: v1(62.895,59.805) R9.1@63.76,58.94
NetR13_2: R13.2 R14.1 SW3.3 SW3.4 | length 22.6
  Top Layer w0.254: 46.65,25.069 ccw(c46.719,25.069) 46.719,25.001
  Top Layer w0.381: R13.2@44.4,27.723 46.09,27.723 SW3.3@46.65,26.85
  Top Layer w0.508: 46.608,24.587 54.687,24.587 ccw(c54.687,25.3) 55.4,25.3 R14.1@55.4,26.716
  Top Layer w0.762: SW3.4@46.65,17.75 46.65,25.069 SW3.3@46.65,26.85
NetR14_2: R14.2 R15.1 SW4.3 SW4.4 | length 22.5
  Top Layer w0.254: 57.65,25.092 ccw(c57.708,25.092) 57.708,25.033
  Top Layer w0.381: R14.2@55.4,27.723 57.09,27.723 SW4.3@57.65,26.85
  Top Layer w0.508: 57.708,24.587 65.787,24.587 ccw(c65.787,25.3) 66.5,25.3 R15.1@66.5,26.716
  Top Layer w0.762: SW4.4@57.65,17.75 57.65,25.033 57.65,25.092 SW4.3@57.65,26.85
NetR15_2: R15.2 R16.1 SW5.3 SW5.4 | length 22.3
  Top Layer w0.254: 68.608,25.006 68.608,25.009
  Top Layer w0.381: R15.2@66.5,27.723 68.048,27.723 SW5.3@68.608,26.81
  Top Layer w0.508: 68.608,24.587 76.687,24.587 ccw(c76.687,25.3) 77.4,25.3 R16.1@77.4,26.716
  Top Layer w0.762: SW5.4@68.608,17.71 68.608,24.587 68.608,25.006 ; 68.608,25.009 SW5.3@68.608,26.81
NetR16_2: R16.2 SW6.3 SW6.4 | length 11.9
  Top Layer w0.381: R16.2@77.4,27.723 79.027,27.723 79.65,27.1 SW6.3@79.65,26.852
  Top Layer w0.762: SW6.4@79.65,17.752 SW6.3@79.65,26.852
NetR20_2: R20.2 U3.3 | length 3.3
  Top Layer w0.381: U3.3@12.2,47.535 14.27,47.535 14.919,48.184 14.923,48.184 15.113,48.374 R20.2@15.113,48.438
NetR39_1: R39.1 U5.6 | length 2.5
  Top Layer w0.203: U5.6@11.368,102.381 12.466,102.381 12.894,101.952 R39.1@13.601,101.952 R39.1@13.601,102.016
NetR40_2: R40.2 R43.1 U5.2 | length 7.2
  Top Layer w0.203: R43.1@9.871,106.254 8.798,106.254 8.509,105.965 8.509,103.17 8.798,102.881 U5.2@9.898,102.881
  Top Layer w0.508: R43.1@9.871,106.254 R40.2@9.871,107.654
NetR41_1: R41.1 R44.2 | length 3.4
  Top Layer w0.254: R44.2@15.125,104.854 15.125,104.918 14.363,105.68 14.363,106.829 15.125,107.591 R41.1@15.125,107.654
NetR42_1: R42.1 U6.25 | length 8.2
  Top Layer w0.203: R42.1@26.345,105.089 26.345,103.312 26.642,103.015 30.16,103.015 U6.25@31.916,101.259
NetR44_1: R44.1 R46.2 U5.8 | length 4.8
  Top Layer w0.203: U5.8@11.368,103.381 12.405,103.381 12.708,103.684 12.708,104.644 12.918,104.854 R44.1@13.601,104.854
  Top Layer w0.508: R44.1@13.601,104.854 R46.2@13.601,106.254
NetR45_2: R45.2 U5.1 | length 1.5
  Top Layer w0.203: R45.2@9.871,104.854 9.898,104.827 U5.1@9.898,103.381
NetR50_2: R50.2 U6.3 | length 9.3
  Top Layer w0.203: R50.2@25.74,89.675 26.019,89.954 26.019,90.029 28.1,92.11 28.1,95.061 U6.3@30.148,97.109
NetR51_2: R51.2 U6.2 | length 8.4
  Top Layer w0.203: R51.2@25.74,91.175 26.545,91.175 27.6,92.23 27.6,95.268 U6.2@29.794,97.462
NetR52_1: R52.1 U6.9 | length 7.7
  Top Layer w0.203: U6.9@32.884,95.341 34.1,94.125 R52.1@34.1,88.124
NetR55_2: R55.2 U6.4 | length 10.6
  Top Layer w0.203: R55.2@25.714,88.175 25.714,88.238 25.994,88.518 25.999,88.518 26.889,89.408 26.889,90.281 28.527,91.919 28.527,94.781 U6.4@30.501,96.755
NetR57_1: R57.1 U6.16 | length 5.7
  Top Layer w0.203: U6.16@35.359,97.816 36.169,98.625 39.652,98.625 R57.1@40.384,97.894
NetR58_1: R58.1 U7.4
NetR61_1: R61.1 R63.2 | length 13.3
  Top Layer w0.381: R63.2@61.456,113.333 v1(61.456,114.427) ; R61.1@62.897,105.868 v1@64.11,105.868
  Bottom Layer w0.381: v1(61.456,114.427) 63.602,114.427 cw(c63.602,113.919) 64.11,113.919 v1(64.11,105.867)
NetR62_2: R62.2 U7.5 | length 5.8
  Top Layer w0.254: U7.5@59.287,109.391 62.397,109.391 ccw(c62.397,109.891) 62.897,109.891 R62.2@62.897,111.809
NetR63_1: R63.1 R66.2 U7.6
NetR64_2: R64.2 U6.20 | length 6.6
  Top Layer w0.203: U6.20@34.299,99.845 37.574,103.121 R64.2@37.574,105.089
NetR67_1: R67.1 R68.2 U8.16 | length 12.1
  Top Layer w0.381: v1(60.276,30.988) U8.16@60.276,32.161 ; R67.1@65.459,33.047 R68.2@66.552,33.047 v1(66.552,33.924)
  Layer 2 w0.381: v1(60.276,30.988) 60.276,33.412 cw(c60.789,33.412) 60.789,33.924 v1(66.552,33.924)
NetR82_1: R82.1 R83.2 R85.2 U12.1 | length 11.7
  Top Layer w0.178: R82.1@13.843,81.605 R82.1@13.843,81.61
  Top Layer w0.305: R82.1@13.843,81.5 14.017,81.674 14.082,81.608 14.948,81.608 14.95,81.605 15.006,81.549 15.164,81.549 15.212,81.5 U12.1@15.975,81.5
  Top Layer w0.381: R85.2@19.369,81.662 R83.2@20.816,81.662 v1@21.844,81.662
  Bottom Layer w0.178: v1@14.95,81.605 v1@14.96,81.595 ; v1@21.834,81.595 v1@21.844,81.585
  Bottom Layer w0.381: v1@14.96,81.656 v1@21.834,81.656
  other v1: 14.95,81.656 21.844,81.656
NetR84_1: R84.1 U12.4 | length 1.3
  Top Layer w0.381: R84.1@17.925,78.903 U12.4@17.925,80.2
NetR87_2: R87.2 U13.24 | length 5.2
  Top Layer w0.178: R87.2@67.64,33.047 R87.2@67.67,33.077 ; U13.24@67.67,37.856 67.731,37.917 U13.24@67.982,37.917
  Top Layer w0.305: R87.2@67.67,33.077 U13.24@67.67,37.856
NetR88_2: R88.2 R89.2 U13.9 | length 4.6
  Top Layer w0.178: R88.2@70.947,48.139 70.947,44.952 U13.9@70.982,44.917
  Top Layer w0.508: R89.2@69.581,48.139 R88.2@70.972,48.139
NetR90_2: R90.2 U13.35 | length 3.6
  Top Layer w0.178: U13.35@74.482,36.417 74.504,36.395 74.504,33.744 ccw(c75.04,33.744) 74.661,33.365 74.828,33.198 74.828,33.187 74.968,33.047 R90.2@75.056,33.047
NetR91_2: R91.2 U13.36 | length 4.3
  Top Layer w0.254: U13.36@74.982,36.417 75.654,36.417 cw(c75.654,35.958) 76.113,35.958 R91.2@76.113,33.047
NetR92_1: R92.1 U13.5 | length 2.5
  Top Layer w0.254: U13.5@72.981,44.918 v1@72.981,46.086
  Bottom Layer w0.381: R92.1@72.98,44.736 v1(72.98,46.087)
NetR94_1: R94.1 U13.8 | length 6.2
  Top Layer w0.254: U13.8@71.482,44.917 71.491,44.925 71.491,47.176 v1(71.5,47.184)
  Bottom Layer w0.381: R94.1@69.962,44.587 69.962,46.59 cw(c70.557,46.59) 70.557,47.184 v1(71.5,47.184)
NetR95_2: R95.2 U13.10 | length 5.2
  Top Layer w0.254: R95.2@68.224,48.139 68.224,47.407 ccw(c68.565,47.407) 68.565,47.066 70.079,47.066 cw(c70.079,46.663) 70.482,46.663 U13.10@70.482,44.917
NetR102_1: R102.1 R104.2 U15.10 | length 2.6
  Top Layer w0.381: U15.10@56.696,92.371 R102.1@56.696,93.684 R104.2@56.696,94.984
NetR105_2: R105.2 U15.4 | length 3.4
  Top Layer w0.254: U15.4@56.71,88.409 58.86,88.409 59.422,87.846 59.436,87.846 59.69,87.592 R105.2@59.69,87.529
NetR106_2: R106.2 U15.5 | length 3
  Top Layer w0.254: U15.5@56.71,89.059 59.688,89.059 R106.2@59.69,89.056
NetR107_2: R107.2 U15.8 | length 3.1
  Top Layer w0.254: U15.8@56.71,91.009 59.441,91.009 R107.2@59.69,91.258
NetR108_2: R108.2 U15.9 | length 3.4
  Top Layer w0.254: U15.9@56.71,91.659 58.778,91.659 59.69,92.57 R108.2@59.69,92.634
NetR110_2: R110.2 R111.1
NetR115_2: 
NetTP1_1: TP1.1 U1.92 | length 22.8
  Top Layer w0.178: U1.92@63.646,57.913 64.92,56.639 64.92,53.952 65.259,53.614 71.745,53.614 ccw(c71.745,53.866) 71.997,53.866 71.997,62 cw(c72.396,62) 72.396,62.399 TP1.1@74.627,62.399
NetTP2_1: TP2.1 U1.91 | length 21.7
  Top Layer w0.178: U1.91@63.364,57.63 64.564,56.429 64.564,53.805 65.111,53.258 72.133,53.258 72.248,53.3 72.331,53.382 ccw(c72.133,53.477) 72.353,53.477 72.353,60.279 cw(c72.718,60.279) 72.718,60.644 TP2.1@74.627,60.644
NetTP3_1: TP3.1 U1.90 | length 20.7
  Top Layer w0.178: U1.90@63.081,57.347 64.209,56.219 64.209,53.658 64.964,52.903 72.461,52.903 ccw(c72.461,53.15) 72.708,53.15 72.708,58.62 cw(c73.018,58.62) 73.018,58.93 TP3.1@74.627,58.93
NetTP4_1: TP4.1 U1.89 | length 19.5
  Top Layer w0.178: U1.89@62.798,57.064 62.798,57.048 63.853,55.993 63.853,53.511 64.817,52.547 72.829,52.547 ccw(c72.829,52.798) 73.081,52.798 73.081,56.87 cw(c73.363,56.87) 73.363,57.152 TP4.1@74.627,57.152
NetTP5_1: TP5.1 U1.78 | length 16.9
  Top Layer w0.178: U1.78@59.687,53.953 60.582,53.058 63.02,53.058 63.023,53.061 63.538,53.061 63.541,53.058 63.803,53.058 64.669,52.191 74.271,52.191 ccw(c74.271,52.547) 74.627,52.547 TP5.1@74.627,53.614
NetTP6_1: TP6.1 U1.77 | length 21.8
  Top Layer w0.178: U1.77@59.404,53.67 60.373,52.702 63.167,52.702 63.17,52.705 63.391,52.705 63.394,52.702 63.656,52.702 64.522,51.836 75.509,51.836 ccw(c75.509,52.222) 75.895,52.222 75.895,55.042 ccw(c75.563,55.042) 75.563,55.374 TP6.1@74.627,55.374
NetTP7_1: TP7.1 U8.15 | length 1.4
  Top Layer w0.305: TP7.1@59.108,29.718 U8.15@59.108,31.07
NetTP8_1: TP8.1 U14.34 | length 33.9
  Top Layer w0.381: v1(95.394,101.95) U14.34@97.75,101.95 ; v1(97.663,74.93) 97.691,74.902 100.101,74.902 TP8.1@100.128,74.875
  Bottom Layer w0.381: v1(95.394,101.95) 97.108,101.95 cw(c97.108,101.395) 97.663,101.395 v1(97.663,74.93)
NetTP9_1: TP9.1 U13.2 | length 15.5
  Top Layer w0.178: U13.2@74.482,44.917 74.482,48.5 cw(c74.832,48.5) 74.832,48.85 79.58,48.85 cw(c79.58,48.421) 80.009,48.421 80.009,44.914 ccw(c80.445,44.914) 80.445,44.478 TP9.1@82.161,44.478
NetTP10_1: TP10.1 U14.128 | length 13.6
  Top Layer w0.381: U14.128@94.5,81 v1(95.7,81) ; v1(95.7,72.998) 100.101,72.998 TP10.1@100.128,72.97
  Bottom Layer w0.254: v1@95.7,73.025 v1(95.7,81)
NetTP11_1: TP11.1 U13.3 | length 15
  Top Layer w0.178: U13.3@73.982,44.917 73.982,48.881 cw(c74.332,48.881) 74.332,49.231 79.904,49.231 cw(c79.904,48.745) 80.39,48.745 80.39,46.632 ccw(c80.798,46.632) 80.798,46.224 TP11.1@82.161,46.224
NetTP12_1: TP12.1 U13.22 | length 23.5
  Top Layer w0.229: v1(65.22,39.486) 65.513,39.127 ccw(c65.955,39.486) 65.955,38.917 U13.22@67.982,38.917
  Top Layer w0.254: v1@78.564,42.731 TP12.1@82.161,42.731
  Bottom Layer w0.254: v1@65.22,39.512 65.681,39.05 ccw(c65.943,39.313) 65.943,38.942 73.551,38.942 ccw(c73.551,39.364) 73.972,39.364 73.972,42.231 cw(c74.448,42.231) 74.032,42.462 cw(c74.448,42.231) 74.448,42.706 78.544,42.706 ccw(c78.544,42.727) v1(78.564,42.727)
NetTP13_1: TP13.1 U13.21 | length 25.1
  Top Layer w0.254: v1(66.294,39.522) 66.388,39.522 66.47,39.439 67.96,39.439 U13.21@67.982,39.417
  Top Layer w0.381: v1(81.135,47.971) TP13.1@82.161,47.971
  Bottom Layer w0.254: v1(66.294,39.522) 73.102,39.522 ccw(c73.102,39.96) 73.54,39.96 73.54,42.603 cw(c74.24,42.603) 74.24,43.303 77.245,43.303 ccw(c77.245,43.879) 77.821,43.879 77.821,47.384 cw(c78.408,47.384) 78.408,47.971 v1(81.135,47.971)
NetTP14_1: TP14.1 U13.4 | length 13.3
  Top Layer w0.178: U13.4@73.482,44.917 73.522,44.956 73.522,49.263 cw(c73.976,49.263) 73.976,49.718 TP14.1@82.161,49.718
NetTP15_1: TP15.1 U13.6 | length 15.6
  Top Layer w0.178: U13.6@72.482,44.917 72.439,44.96 72.439,46.138 cw(c73.001,46.138) 72.603,46.535 72.912,46.844 ccw(c72.505,47.251) 73.081,47.251 73.081,50.8 cw(c73.745,50.8) 73.745,51.464 TP15.1@82.161,51.464
NetU3_2: U3.2 X3.2 | length 3.6
  Top Layer w0.381: U3.2@12.2,46.265 14.6,46.265 15.2,46.865 X3.2@15.6,46.865
NRST: J10.7 R118.1 R119.1 | length 3.9
  Top Layer w0.254: R118.1@25.38,112.73 25.38,111.922 26,111.302 J10.7@26,111 26,111.311 26.61,111.922 R119.1@26.61,112.663
PCA0: 
PCA1: 
PCA2: 
PCA3: 
PCA4: 
PCA5: 
PCA6: 
PCA7: 
PE20: U1.10
PENIRQ: U11.7
PG0: R117.2 U1.5 | length 82.1
  Top Layer w0.178: v1@49.77,73.675 49.77,71.789 U1.5@52.899,68.66 ; v1(68.3,73.746) 68.3,70.773 ccw(c68.893,70.773) 68.894,70.18 105.399,70.18 ccw(c105.399,72.31) 107.529,72.31 107.529,84.554 ccw(c107.081,84.554) 107.081,85.003 R117.2@106.494,85.003
  Bottom Layer w0.254: v1(49.77,73.746) v1(68.3,73.746)
PG1: U1.4
PG2: U1.3
PG3: U1.2
PG5: U1.128
RTC_VIO: C25.2 U1.97 | length 3.7
  Top Layer w0.178: U1.97@64.778,61.023 65.079,61.325 65.095,61.325 66.24,60.18 66.241,60.179 ccw(c66.439,60.377) 66.638,60.179 C25.2@67.492,61.033
SDC0-CLK0: D2.2 J1.5 U1.105 | length 51.1
  Top Layer w0.178: U1.105@62.515,63.286 67.853,68.624 100.743,68.624 cw(c100.743,68.176) 101.191,68.176 101.191,62.031 cw(c100.616,62.031) 101.023,61.625 100.522,61.124 D2.2@100.522,61.024
  Top Layer w0.305: J1.5@100.522,58.505 v1(100.522,60.049) D2.2@100.522,61.024
SDC0-CMD: D3.2 J1.3 R2.1 U1.103 | length 49.2
  Top Layer w0.178: U1.103@63.081,62.721 68.51,68.15 98.702,68.15 cw(c98.702,67.608) 99.244,67.608 99.244,62.149 cw(c98.37,62.149) 98.988,61.531 98.582,61.124 D3.2@98.582,61.024 D3.2@98.556,60.999 ; J1.3@98.322,58.505 J1.3@98.556,58.739
  Top Layer w0.305: J1.3@98.556,58.739 v1(98.556,60.049) D3.2@98.556,60.999
  Bottom Layer w0.203: R2.1@98.556,61.003 R2.1@98.582,61.029
  Bottom Layer w0.254: v1(98.556,60.049) R2.1@98.556,61.003
SDC0-D0: D4.2 J1.7 R3.1 U1.106 | length 55
  Top Layer w0.178: U1.106@62.232,63.569 67.787,69.124 102.554,69.124 cw(c102.554,68.542) 103.137,68.542 103.137,62.156 cw(c102.272,62.156) 102.883,61.545 102.463,61.124 102.463,61.024 D4.2@102.492,60.995 ; J1.7@102.492,58.735 J1.7@102.722,58.505
  Top Layer w0.305: J1.7@102.492,58.735 v1(102.492,60.049) D4.2@102.492,60.995
  Bottom Layer w0.203: R3.1@102.492,60.902 102.619,61.029 R3.1@102.68,61.029
  Bottom Layer w0.254: v1(102.492,60.049) R3.1@102.492,60.902
SDC0-D1: D5.2 J1.8 R4.1 U1.107 | length 57.1
  Top Layer w0.178: U1.107@61.949,63.852 67.721,69.624 103.934,69.624 cw(c103.934,69.107) 104.452,69.107 104.452,62.244 cw(c103.332,62.244) 104.124,61.453 ; J1.8@103.796,58.532 J1.8@103.822,58.505 ; D5.2@103.796,61.024 103.796,61.124 104.124,61.452
  Top Layer w0.305: J1.8@103.796,58.532 v1(103.796,60.049) D5.2@103.796,61.024
  Bottom Layer w0.203: R4.1@103.796,60.902 103.923,61.029 R4.1@104,61.029
  Bottom Layer w0.254: v1(103.796,60.049) R4.1@103.796,60.902
SDC0-D2: D6.2 J1.1 R5.1 U1.101 | length 44.8
  Top Layer w0.178: U1.101@63.646,62.155 68.692,67.201 95.993,67.201 cw(c95.993,66.604) 96.59,66.604 96.59,62.176 cw(c95.682,62.176) 96.324,61.534 96.016,61.226 96.016,61.123 D6.2@95.917,61.024 ; J1.1@95.917,58.71 J1.1@96.122,58.505
  Top Layer w0.305: J1.1@95.917,58.71 v1(95.917,60.049) D6.2@95.917,61.024
  Bottom Layer w0.254: v1(95.917,60.049) R5.1@95.917,61.029
SDC0-D3: D7.2 J1.2 R6.1 U1.102 | length 46.8
  Top Layer w0.178: U1.102@63.364,62.438 68.596,67.67 97.363,67.67 cw(c97.363,67.116) 97.917,67.116 97.917,62.16 cw(c97.026,62.16) 97.656,61.531 D7.2@97.25,61.124 ; J1.2@97.222,58.505 J1.2@97.275,58.558
  Top Layer w0.305: J1.2@97.25,58.558 v1(97.25,60.049) D7.2@97.25,61.024
  Bottom Layer w0.254: v1(97.25,60.049) R6.1@97.25,61.029
SDC0-DET: D8.2 J1.SN R7.1 U1.100 | length 67.8
  Top Layer w0.178: U1.100@63.929,61.872 68.624,66.567 69.6,66.567 v1(95.098,66.567)
  Top Layer w0.305: v1(105.117,60.049) D8.2@105.117,61.024 106.674,61.024 cw(c106.674,60.536) 107.162,60.536 107.162,52.082 cw(c104.141,52.082) 106.434,50.114 J1.SN@105.877,49.545
  Bottom Layer w0.254: v1(95.098,66.567) 105.747,66.567 cw(c105.747,65.786) 106.528,65.786 106.528,60.455 cw(c106.121,60.455) 106.121,60.049 v1(105.117,60.049) 105.117,60.902 105.244,61.029 R7.1@105.321,61.029
SPI-CLK: U1.53 U2.6 | length 19.9
  Top Layer w0.178: U2.6@38.115,46.535 37.207,46.535 cw(c37.207,46.786) 36.957,46.786 36.957,49.983 cw(c37.392,49.983) 37.392,50.419 47.951,50.419 U1.53@50.919,53.387
SPI-CS: R10.1 U1.54 U2.1 | length 19.5
  Top Layer w0.178: U2.1@45.715,43.995 48.426,43.995 ccw(c48.426,44.571) 49.002,44.571 v1(49.002,49.414) ; U1.54@51.202,53.105 v1(52.545,54.448)
  Top Layer w0.254: R10.1@45.426,41.93 45.426,43.822 45.599,43.995 U2.1@45.715,43.995
  Bottom Layer w0.254: v1(49.002,49.414) 49.002,51.137 cw(c50.261,51.137) 49.37,52.027 51.524,54.181 cw(c52.168,53.538) 52.168,54.448 v1(52.545,54.448)
SPI-MISO: SW2.1 U1.52 U2.2 | length 20
  Top Layer w0.178: SW2.1@42.699,40.227 44.059,40.227 ccw(c44.059,40.582) 44.413,40.582 44.413,44.899 cw(c44.779,44.899) 44.779,45.265 U2.2@45.715,45.265 47.67,45.265 ccw(c47.67,45.695) 48.1,45.695 v1(48.1,49.414) v1@48.1,49.567 ; v1@48.148,51.961 48.927,51.961 U1.52@50.636,53.67
  Bottom Layer w0.254: v1(48.1,49.414) v1@48.1,51.961
  other v1: 48.108,51.961
SPI-MOSI: U1.55 U2.5 | length 16.6
  Top Layer w0.178: U2.5@38.115,47.805 38.115,49.715 cw(c38.463,49.715) 38.463,50.063 48.727,50.063 U1.55@51.485,52.822
SVREF: C14.2 C15.2 R27.1 R29.2 U1.63 U1.71 | length 9.4
  Top Layer w0.178: U1.63@53.748,50.559 v1@56.401,53.212 ; v1@56.463,53.217 U1.71@57.707,51.973
  Bottom Layer w0.381: R27.1@55.366,50.505 R29.2@56.117,51.256 C14.2@56.868,52.007 ; 56.669,53.011 57.258,52.422 ; C14.2@56.969,52.134 57.198,52.363 ; 57.156,52.295 C15.2@57.618,52.758
  other v1: 56.426,53.237
SZQ: R30.2 U1.73 | length 6.9
  Top Layer w0.178: U1.73@58.273,52.539 58.74,52.071 59.478,51.334 cw(c59.261,51.116) 59.478,50.899 57.56,48.981 ccw(c57.796,48.744) 57.56,48.507 R30.2@58.6,47.467
TPS_EN1: R70.1 R74.2 U6.31 | length 8.5
  Top Layer w0.203: R74.2@24.216,95.955 24.216,96.019 24.954,96.758 26.144,96.758 28.986,99.6 29.332,99.6 U6.31@29.794,99.138
  Top Layer w0.381: R70.1@22.987,95.955 R74.2@24.216,95.955
TPS_EN2: R71.1 R75.2 U6.32 | length 10.3
  Top Layer w0.203: R75.2@24.216,94.336 24.216,94.273 24.961,93.528 26.37,93.528 26.615,93.773 26.615,95.959 U6.32@29.441,98.784
  Top Layer w0.381: R71.1@22.987,94.336 R75.2@24.216,94.336
TPS_EN3: R72.1 R76.2 U6.1 | length 11.1
  Top Layer w0.203: R76.2@24.216,92.717 24.216,92.654 24.928,91.941 26.714,91.941 27.1,92.327 27.1,95.475 U6.1@29.441,97.816
  Top Layer w0.381: R72.1@22.987,92.717 R76.2@24.216,92.717
TPS_FB1: C55.2 R47.2 R48.1 U6.22 | length 8.3
  Top Layer w0.203: U6.22@33.591,100.552 36.153,103.114 R47.2@36.153,105.089
  Top Layer w0.381: R47.2@35.769,105.063 R47.2@36.044,105.063
  Top Layer w0.508: R48.1@33.312,105.063 C55.2@34.732,105.063 R47.2@35.769,105.063
TPS_FB2: C66.2 R53.2 R54.1 U6.6 | length 10.2
  Top Layer w0.203: R54.1@29.864,89.236 29.864,94.703 U6.6@31.208,96.048
  Top Layer w0.508: C66.2@29.854,86.705 R54.1@29.854,89.541
TPS_FB3: C73.2 R59.1 R60.1 U6.19 | length 9.9
  Top Layer w0.203: U6.19@34.652,99.492 38.777,103.617 38.777,104.871 R60.1@38.995,105.089
  Top Layer w0.508: R60.1@39.198,105.063 C73.2@40.416,105.063 R59.1@41.707,105.063
TPS_VDIV: R69.1 R73.2 U6.30 | length 8.5
  Top Layer w0.203: R73.2@24.216,97.574 24.216,97.638 24.495,97.917 24.503,97.917 26.635,100.05 29.589,100.05 U6.30@30.148,99.492
  Top Layer w0.381: R69.1@22.987,97.574 R73.2@24.216,97.574
TS_XN: J4.2 U11.4 | length 5.3
  Top Layer w0.178: J4.2@3.25,60.75 5.226,60.75 cw(c5.226,60.276) 5.7,60.276 U11.4@5.7,57.7
TS_XP: J4.4 U11.2 | length 7.2
  Top Layer w0.178: J4.4@3.25,61.75 6.05,61.75 cw(c6.05,61.1) 6.7,61.1 U11.2@6.7,57.7
TS_YN: J4.1 U11.5 | length 4.2
  Top Layer w0.178: J4.1@3.25,60.25 4.453,60.25 cw(c4.453,59.503) 5.2,59.503 U11.5@5.2,57.7
TS_YP: J4.3 U11.3 | length 6.2
  Top Layer w0.178: J4.3@3.25,61.25 5.55,61.25 cw(c5.55,60.6) 6.2,60.6 U11.3@6.2,57.7
UART0_RX: U1.49 U4.2 | length 19.5
  Top Layer w0.178: U4.2@31.873,50.404 32.426,50.595 cw(c33.312,49.083) 33.312,50.835 46.104,50.835 U1.49@49.788,54.519
UART0_TX: U1.48 U4.3 | length 19.2
  Top Layer w0.178: U4.3@31.873,51.674 32.316,51.484 ccw(c33.675,54.488) 33.677,51.191 ; 33.678,51.191 45.895,51.191 U1.48@49.505,54.801
UART1_RX: J10.4 Q7.2 U1.8 | length 143.1
  Top Layer w0.178: v2(23.054,73.203) 46.659,73.203 U1.8@52.05,67.812
  Top Layer w0.254: Q7.2@21.697,8.352 Q7.2@21.7,8.35 21.7,6.362 v1(21.702,6.36)
  Bottom Layer w0.254: J10.4@18.5,111 18.5,109.381 ccw(c19.039,109.381) 19.039,108.842 22.431,108.842 cw(c22.431,108.219) 23.054,108.219 v2(23.054,73.203) 23.054,6.826 cw(c22.538,6.826) 22.538,6.31 21.752,6.31 cw(c21.752,6.36) v1(21.702,6.36)
UART1_TX: J10.3 Q6.2 U1.9 | length 133.9
  Top Layer w0.178: v2(22.444,72.707) 46.589,72.707 U1.9@51.767,67.529
  Top Layer w0.254: v1(22.444,16.647) 22.446,16.645 Q6.2@22.446,14.658
  Bottom Layer w0.254: J10.3@16,111 16,108.906 ccw(c16.578,108.906) 16.578,108.328 22.122,108.328 cw(c22.122,108.007) 22.444,108.007 v2@22.444,72.72 ; v1(22.444,16.647) v2@22.444,72.517 ; 22.444,72.263 v2@22.444,72.466
UART2_RX: U1.40 U15.16 | length 56.4
  Top Layer w0.178: v2(44.428,55.87) 46.048,55.87 U1.40@47.242,57.064
  Top Layer w0.254: U15.16@51.11,89.059 53.417,89.059 cw(c53.417,88.748) 53.729,88.748 v1@53.729,73.375
  Bottom Layer w0.254: v2(44.428,55.87) 40.726,55.87 cw(c40.726,56.67) 39.926,56.67 39.926,72.477 cw(c40.57,72.477) 40.57,73.121 v1(53.729,73.121)
UART2_TX: U1.39 U15.17 | length 52.7
  Top Layer w0.178: v2(43.748,56.418) 46.03,56.418 U1.39@46.959,57.347
  Top Layer w0.254: U15.17@51.11,88.409 52.766,88.409 cw(c52.766,88.063) 53.111,88.063 v1@53.111,72.675
  Bottom Layer w0.254: v2(43.748,56.418) 41.017,56.418 cw(c41.017,56.998) 40.437,56.998 40.437,71.855 cw(c41.003,71.855) 41.003,72.421 v1(53.111,72.421)
USB-D_N: U1.110 U13.27 | length 60.4
  Top Layer w0.254: 61.731,65.308 62.315,65.892 cw(c62.495,65.713) 62.47,65.965 v1(62.711,65.989) ; U13.27@70.482,36.417 70.482,35.098 ccw(c71.086,35.098) v1(70.659,34.671)
  Bottom Layer w0.254: v1(62.711,65.989) ccw(c62.551,66.149) 62.777,66.149 cw(c63.272,66.149) 62.922,66.499 63.836,67.413 ; 63.836,67.413 63.838,67.415 cw(c64.574,66.679) 65.312,67.414 ; 65.312,67.414 70.449,62.276 cw(c69.74,61.564) 70.451,60.854 60.923,51.308 ccw(c61.409,50.824) 60.914,51.299 60.852,51.234 ccw(c61.347,50.759) 60.841,51.222 ccw(c62.986,49.248) 60.071,49.248 60.071,33.332 ccw(c61.305,33.332) 61.305,32.098 69.373,32.098 ccw(c69.373,33.173) 70.448,33.173 70.448,34.46 cw(c70.659,34.46) v1(70.659,34.671)
USB-D_P: U1.111 U13.26 | length 60
  Top Layer w0.254: 61.426,65.614 62.009,66.197 ; 62.01,66.198 ccw(c61.83,66.377) 62.083,66.352 v1(62.107,66.593) ; v1(69.805,34.671) ccw(c69.378,35.098) 69.982,35.098 U13.26@69.982,36.417
  Bottom Layer w0.254: v1(62.107,66.593) cw(c62.267,66.433) 62.267,66.659 ccw(c62.267,67.154) 62.616,66.804 63.531,67.718 63.533,67.72 cw(c64.574,66.679) 65.616,67.72 65.617,67.719 70.755,62.581 cw(c69.74,61.564) 70.756,60.549 61.229,51.003 ccw(c61.409,50.824) 61.226,51 61.163,50.935 ccw(c61.347,50.759) 61.159,50.93 ccw(c62.986,49.248) 60.503,49.248 60.503,33.332 ccw(c61.305,33.332) 61.305,32.53 61.94,32.53 66.157,32.53 69.373,32.53 ccw(c69.373,33.173) 70.016,33.173 70.016,34.46 ccw(c69.805,34.46) v1(69.805,34.671)